# Altium PCB 新执行器202608.PcbDoc (part 2 of 2)
Units mm, origin at the board's own origin, x right, y up, seen from the top; angles counter-clockwise.
Board outline 67.11 x 92.2 mm, 2 copper layers (Top Layer, Bottom Layer); 111 components, 81 nets, 454 pads, 489 vias.
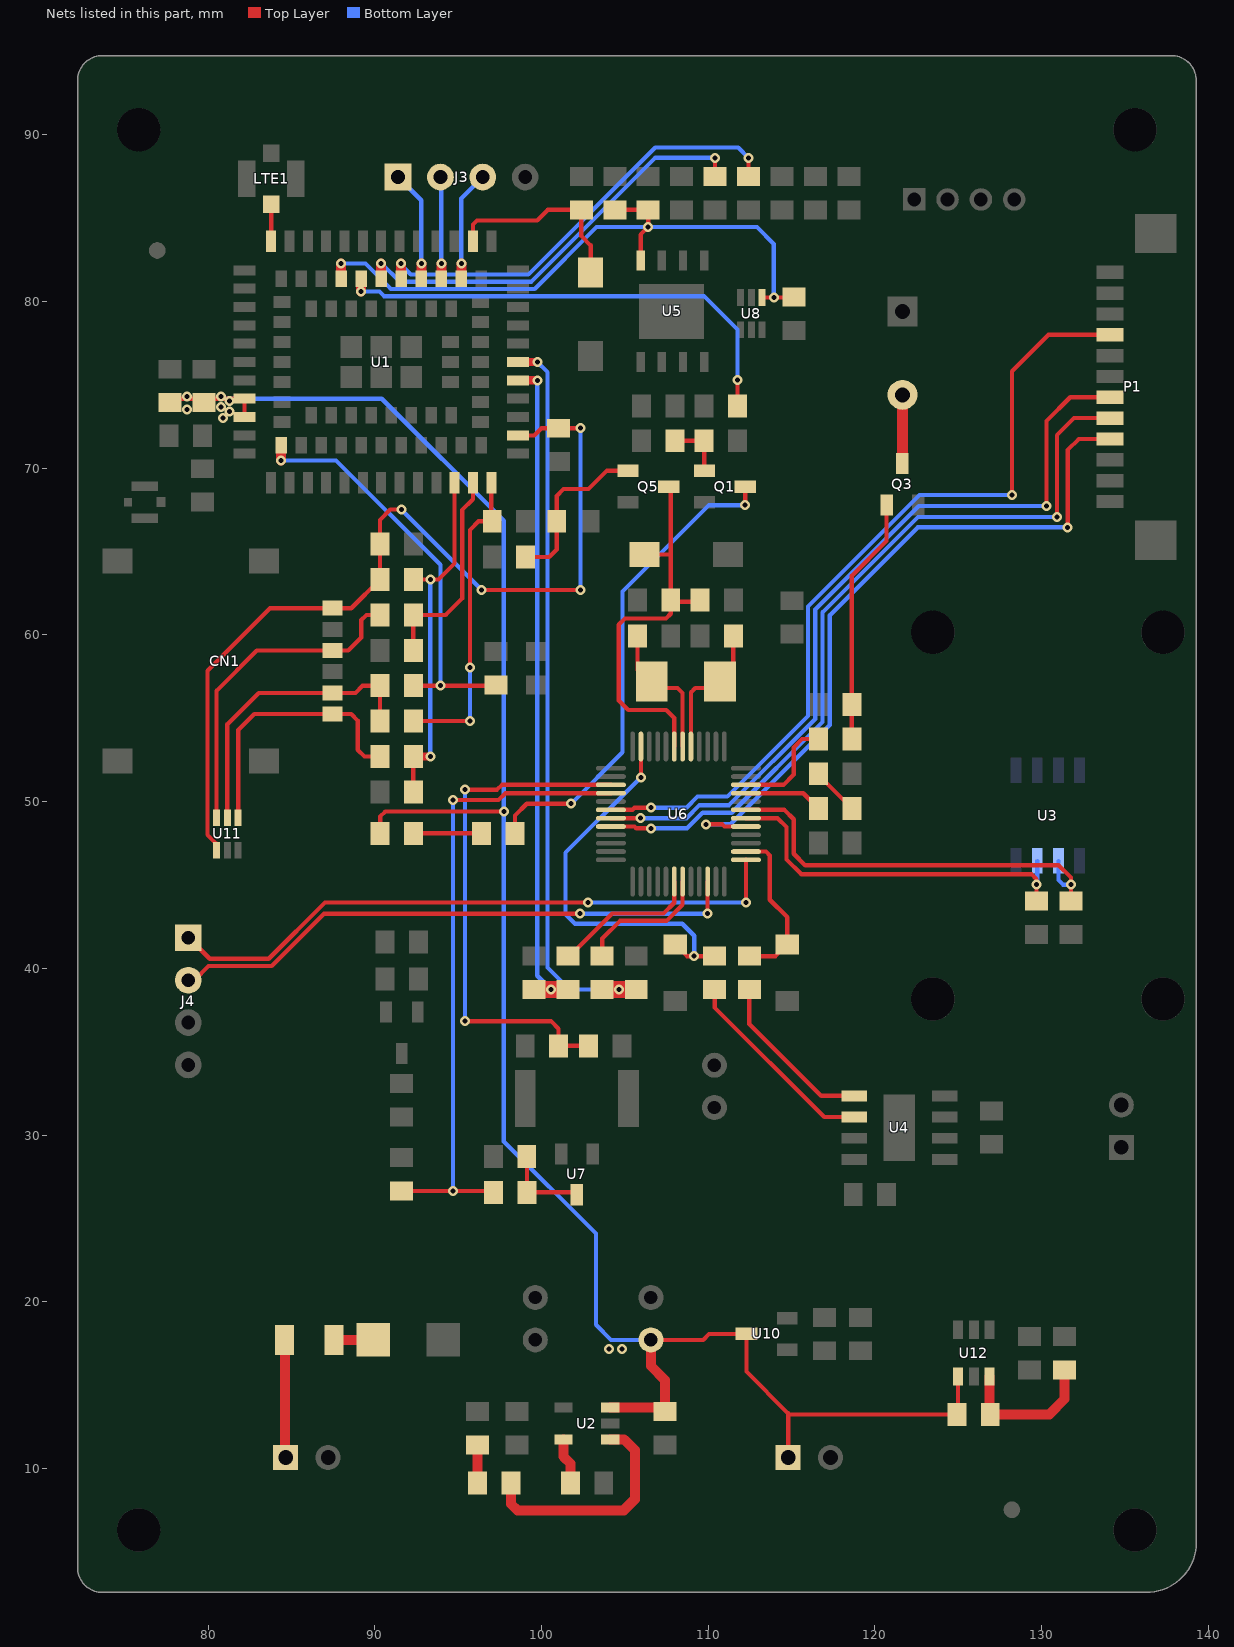
[diagram p2: the nets of this part, all layers, seen from the top]

## Via types
v1: diameter 0.6, hole 0.3, Top Layer to Bottom Layer, tented both sides, 330 vias
v2: diameter 0.65, hole 0.35, Top Layer to Bottom Layer, tented both sides, 147 vias
v3: diameter 0.6, hole 0.3, Top Layer to Bottom Layer, 12 vias

## Nets (pads, with @x,y where several pads share a name; then routed paths per layer and width w, separated by ;. In a path a pad name is that pad's centre, name@x,y a point inside that pad or via, vN(x,y) a via of type N, cw(c..) or ccw(c..) an arc to the next point about the centre after c; other vN are vias at no path point) (continued)
NetC31_1: C31.1 R44.2 U12.6 | length 8.8
  Top Layer w0.6: R44.2@126.878,13.271 U12.6@126.878,15.511 ; R44.2@126.913,13.236 130.457,13.236 131.377,14.156 C31.1@131.377,15.911
NetCN1_3: CN1.3 R43.1 U11.6 | length 19.9
  Top Layer w0.254: U11.6@80.501,49.03 80.501,56.646 82.917,59.062 CN1.3@87.454,59.062 88.399,59.062 89.186,59.849 89.186,60.893 89.494,61.201 R43.1@90.307,61.201
NetCN1_5: CN1.5 R45.1 R50.2 U11.5 | length 17.8
  Top Layer w0.254: U11.5@81.151,49.03 81.151,54.639 83.034,56.522 CN1.5@87.454,56.522 88.83,56.522 89.261,56.953 R50.2@90.307,56.953 R45.1@90.307,54.83
NetCN1_6: CN1.6 R48.1 U11.4 | length 16.2
  Top Layer w0.254: U11.4@81.801,49.03 81.801,54.29 82.763,55.252 CN1.6@87.454,55.252 88.585,55.252 88.969,54.868 88.969,53.11 89.373,52.706 R48.1@90.307,52.706
NetD1_1: D1.1 F1.2 | length 2.3
  Top Layer w0.6: F1.2@87.554,17.71 D1.1@89.904,17.71
NetD2_1: D2.1 R2.2 | length 4.1
  Top Layer w0.254: R2.2@92.317,48.096 D2.1@96.399,48.096
NetD2_2: D2.2 Q1.3 | length 29.4
  Top Layer w0.254: D2.2@98.399,48.096 98.399,49.159 99.112,49.872 v1(101.755,49.872) ; v1(112.215,67.785) Q1.3@112.215,68.903
  Bottom Layer w0.254: v1@101.761,49.867 104.854,52.96 104.854,62.598 110.041,67.785 v1(112.215,67.785)
NetD3_1: D3.1 R1.1 | length 2.3
  Top Layer w0.6: D3.1@96.158,9.134 R1.1@96.158,11.414
NetD3_2: D3.2 U2.1 | length 13.8
  Top Layer w0.6: D3.2@98.167,9.125 98.167,7.873 98.551,7.489 104.932,7.489 105.591,8.148 105.591,11.105 104.956,11.74 U2.1@104.117,11.74
NetD6_1: D6.1 R49.1 | length 2.9
  Top Layer w0.254: R49.1@116.612,51.671 116.612,51.59 D6.1@118.612,49.59
NetF1_1: F1.1 J1.1 | length 7
  Top Layer w0.6: J1.1@84.612,10.692 F1.1@84.612,17.71
NetLS1_2: LS1.2 Q3.3 | length 4.1
  Top Layer w0.65: Q3.3@121.646,70.284 LS1.2@121.646,74.399
NetLTE1_1: LTE1.1 U1.35 | length 2.2
  Top Layer w0.254: U1.35@83.783,83.62 LTE1.1@83.783,85.833
NetQ1_1: Q1.1 R3.1 R4.2 | length 3.5
  Top Layer w0.254: R3.1@108.006,71.648 R4.2@109.754,71.648 Q1.1@109.754,69.863
NetQ3_1: Q3.1 R12.1 R17.2 | length 14.9
  Top Layer w0.254: R12.1@118.612,53.753 R17.2@118.612,55.835 118.612,63.548 120.696,65.632 Q3.1@120.696,67.784
NetQ5_1: Q5.1 R22.2 R23.1 | length 10.2
  Top Layer w0.254: R22.2@99.041,64.677 100.46,64.677 100.911,65.128 R23.1@100.911,66.818 100.911,68.34 101.32,68.749 102.816,68.749 103.92,69.853 Q5.1@105.189,69.853
NetR5_2: R5.2 U2.5 | length 2.8
  Top Layer w0.6: U2.5@101.317,11.74 101.317,10.705 101.728,10.294 R5.2@101.728,9.125
NetR24_1: R24.1 U4.1 | length 10.1
  Top Layer w0.254: R24.1@112.461,38.73 112.461,36.667 116.779,32.349 U4.1@118.753,32.349
NetR25_1: R25.1 U4.2 | length 12.2
  Top Layer w0.254: R25.1@110.383,38.73 110.383,37.651 116.955,31.079 U4.2@118.753,31.079
NetR32_2: R32.2 R34.2 U7.3 | length 5
  Top Layer w0.254: R34.2@99.122,28.709 R32.2@99.122,26.56 U7.3@101.979,26.56
NetR35_1: R35.1 U6.31 | length 8.1
  Top Layer w0.254: R35.1@103.636,40.73 103.636,41.783 104.701,42.848 107.494,42.848 108.461,43.815 U6.31@108.461,45.206
NetR36_1: R36.1 U6.30 | length 9
  Top Layer w0.254: R36.1@101.592,40.73 101.69,40.73 104.242,43.282 107.314,43.282 107.961,43.929 U6.30@107.961,45.206
NRST: C8.2 Q5.3 R21.1 S1.2 U6.7 | length 24.2
  Top Layer w0.254: S1.2@106.184,64.826 107.748,64.826 ; Q5.3@107.748,68.793 C8.2@107.748,61.986 ; U6.7@107.961,53.306 107.961,55.013 107.482,55.492 105.2,55.492 104.628,56.064 104.628,60.614 105.004,60.99 107.47,60.99 107.748,61.268 C8.2@107.748,61.986 ; R21.1@109.474,61.986 C8.2@107.748,61.986
OSC_IN: C7.2 U6.5 Y1.2 | length 8.4
  Top Layer w0.254: U6.5@108.961,53.306 108.961,56.555 109.22,56.814 110.723,56.814 111.505,57.596 C7.2@111.505,59.82
OSC_OUT: C9.2 U6.6 Y1.1 | length 8.5
  Top Layer w0.254: C9.2@105.748,59.82 105.748,57.892 Y1.1@106.604,57.036 ; Y1.1@106.503,56.935 106.623,56.814 108.159,56.814 108.461,56.512 U6.6@108.461,53.306
PA1: D5.2 R25.2 U6.11 | length 24.1
  Top Layer w0.254: v1(105.961,51.447) U6.11@105.961,53.306 ; D5.2@108.022,41.43 108.722,40.73 v1(109.158,40.73) R25.2@110.383,40.73
  Bottom Layer w0.254: v1(105.961,51.447) 105.948,51.447 101.438,46.937 101.438,43.242 102.01,42.67 108.442,42.67 109.158,41.954 v1(109.158,40.73)
PA5_ADC: R42.2 R47.2 U6.15 | length 31.4
  Top Layer w0.254: v1(95.41,36.83) 100.57,36.83 101.022,36.378 R42.2@101.022,35.352 R47.2@102.819,35.352 ; v1(95.41,50.718) 97.332,50.718 97.62,51.006 U6.15@104.161,51.006
  Bottom Layer w0.254: v1(95.41,36.83) v1(95.41,50.718)
PA6_ADC: C15.1 R32.1 U6.16 | length 38.5
  Top Layer w0.254: C15.1@91.606,26.645 v1(94.689,26.645) R32.1@97.037,26.645 ; v1(94.689,50.096) 97.422,50.096 97.832,50.506 U6.16@104.161,50.506
  Bottom Layer w0.254: v1(94.689,26.645) v1(94.689,50.096)
PA9_TX1: R27.1 R36.2 U1.17 | length 40.1
  Top Layer w0.5: U1.17@98.583,75.27 v1(99.745,75.27)
  Top Layer w1: R27.1@99.548,38.73 v1(100.567,38.73) R36.2@101.592,38.73
  Bottom Layer w0.254: v1(99.745,75.27) 99.745,39.552 v1(100.567,38.73)
PA10_RX1: R28.1 R35.2 U1.18 | length 44.6
  Top Layer w0.5: U1.18@98.583,76.37 v1(99.745,76.37)
  Top Layer w1: R35.2@103.636,38.73 v1(104.657,38.73) R28.1@105.68,38.73
  Bottom Layer w0.254: v1(99.745,76.37) 100.352,75.763 100.352,40.048 101.67,38.73 v1(104.657,38.73)
PA15: D4.2 R24.2 U6.38 | length 9.9
  Top Layer w0.254: U6.38@112.261,47.006 113.457,47.006 113.691,46.772 113.691,44.114 114.737,43.068 D4.2@114.737,41.43 114.037,40.73 R24.2@112.461,40.73
PB0: P1.4 U6.18 | length 49.9
  Top Layer w0.254: U6.18@104.161,49.506 105.449,49.506 105.579,49.636 v1(106.57,49.636) ; v1(128.225,68.396) 128.225,75.818 130.412,78.005 P1.4@134.092,78.005
  Bottom Layer w0.254: v1(106.57,49.636) 108.686,49.636 109.35,50.3 111.146,50.3 115.988,55.142 115.988,61.712 122.672,68.396 v1(128.225,68.396)
PB1: P1.7 U6.19 | length 47.2
  Top Layer w0.254: U6.19@104.161,49.006 v1(105.928,49.006) ; v1(130.289,67.736) 130.289,72.825 131.719,74.255 P1.7@134.092,74.255
  Bottom Layer w0.254: v1(105.928,49.006) 108.699,49.006 109.48,49.787 111.246,49.787 116.422,54.963 116.422,61.532 122.626,67.736 v1(130.289,67.736)
PB2: P1.8 U6.20 | length 46.9
  Top Layer w0.254: U6.20@104.161,48.506 105.57,48.506 105.677,48.399 106.497,48.399 v1@106.57,48.472 ; v1(130.919,67.071) 130.919,71.984 131.94,73.005 P1.8@134.092,73.005
  Bottom Layer w0.254: v1(106.57,48.399) 108.731,48.399 109.665,49.333 111.406,49.333 116.856,54.783 116.856,61.353 122.574,67.071 v1(130.919,67.071)
PB5_WKUP6: P1.9 U6.41 | length 42.8
  Top Layer w0.254: v1(109.853,48.636) 110.844,48.636 110.974,48.506 U6.41@112.261,48.506 ; v1(131.561,66.454) 131.561,71.086 132.23,71.755 P1.9@134.092,71.755
  Bottom Layer w0.254: v1(109.853,48.636) 111.323,48.636 117.29,54.603 117.29,61.173 122.571,66.454 v1(131.561,66.454)
PB6_SCL: R19.2 U3.7 U6.42 | length 22.8
  Top Layer w0.254: U6.42@112.261,49.006 114.16,49.006 114.694,48.472 114.694,46.531 115.576,45.649 129.387,45.649 129.696,45.34 v3(129.696,45.018) R19.2@129.696,44.027
  Bottom Layer w0.254: v3@129.74,45.062 U3.7@129.74,46.445
PB7_SDA: R20.2 U3.6 U6.43 | length 25.8
  Top Layer w0.254: U6.43@112.261,49.506 114.563,49.506 115.128,48.941 115.128,46.871 115.821,46.178 131.029,46.178 131.755,45.452 v3(131.755,45.018) R20.2@131.755,44.027
  Bottom Layer w0.254: U3.6@131.01,46.445 131.01,45.294 131.286,45.018 v3(131.755,45.018)
PB8: D6.2 U6.45 | length 4.7
  Top Layer w0.254: U6.45@112.261,50.506 115.696,50.506 D6.2@116.612,49.59
PB9: R12.2 U6.46 | length 6.4
  Top Layer w0.254: U6.46@112.261,51.006 114.508,51.006 115.127,51.625 115.127,53.252 115.628,53.753 R12.2@116.612,53.753
SIM_CLK: C24.2 R45.2 U1.13 | length 18.7
  Top Layer w0.254: R45.2@92.308,54.83 v1(95.707,54.83) ; v1(95.707,58.053) 95.707,66.301 96.224,66.818 C24.2@97.04,66.818 ; C24.2@96.983,66.876 U1.13@96.983,69.12
  Bottom Layer w0.254: v1(95.707,54.83) v1(95.707,58.053)
SIM_DATA: C23.2 R48.2 R51.1 U1.11 | length 21.5
  Top Layer w0.254: C23.2@92.308,50.583 R48.2@92.308,52.706 ; R51.1@92.308,63.324 v1(93.323,63.324) 93.814,63.324 94.783,64.293 U1.11@94.783,69.12
  Top Layer w0.5: R48.2@92.308,52.706 v1(93.323,52.706)
  Bottom Layer w0.254: v1(93.323,52.706) v1(93.323,63.324)
SIM_RST: C25.2 R43.2 U1.12 | length 12.7
  Top Layer w0.254: C25.2@92.308,59.077 R43.2@92.308,61.201 94.246,61.201 95.236,62.191 95.236,67.492 95.883,68.139 U1.12@95.883,69.12
SIM_VDD: C22.1 C29.2 CN1.1 R51.2 U1.14 U11.1 | length 55.1
  Top Layer w0.254: U11.1@80.501,47.09 80.501,47.465 79.96,48.006 79.96,57.854 83.708,61.602 CN1.1@87.454,61.602 88.586,61.602 R51.2@90.307,63.324 C22.1@90.307,65.448 90.307,66.901 90.923,67.517 v1(91.587,67.517) ; v1(96.408,62.696) v1(102.333,62.696) ; U1.14@98.583,71.97 99.563,71.97 99.994,72.401 C29.2@101.011,72.401 v1(102.333,72.401)
  Bottom Layer w0.254: v1(91.587,67.517) v1(96.408,62.696) ; v1(102.333,62.696) v1(102.333,72.401)
SWCLK: J4.1 U6.37 | length 37.9
  Top Layer w0.254: J4.1@78.808,41.825 78.843,41.825 80.095,40.573 83.637,40.573 87.012,43.948 v1(102.774,43.948) ; v1(112.261,43.948) U6.37@112.261,46.506
  Bottom Layer w0.254: v1(102.774,43.948) v1(112.261,43.948)
SWDIO: J4.2 U6.34 | length 34.7
  Top Layer w0.254: J4.2@78.808,39.285 79.173,39.285 80.027,40.139 83.817,40.139 86.954,43.277 v1(102.307,43.277) ; v1(109.961,43.277) U6.34@109.961,45.206
  Bottom Layer w0.254: v1(102.307,43.277) v1(109.961,43.277)
USB_DN: J3.2 U1.60 | length 6
  Top Layer w0.6: U1.60@93.983,81.37 v1(93.983,82.275)
  Bottom Layer w0.254: v1(93.983,82.275) J3.2@93.983,87.416
USB_DP: J3.3 U1.59 | length 6.6
  Top Layer w0.6: U1.59@95.183,81.37 v1(95.183,82.275)
  Bottom Layer w0.254: v1(95.183,82.275) 95.183,86.176 J3.3@96.473,87.466
USIM2_CLK: R33.1 U1.62 | length 26.6
  Top Layer w0.254: R33.1@112.416,87.499 v1(112.416,88.619)
  Top Layer w0.6: U1.62@91.583,81.37 v1(91.583,82.275)
  Bottom Layer w0.254: v1(91.583,82.275) 91.583,82.191 92.149,81.625 99.207,81.625 106.817,89.235 111.799,89.235 v1(112.416,88.619)
USIM2_DAT: R38.1 U1.64 | length 28.9
  Top Layer w0.254: R38.1@111.755,73.735 v1(111.755,75.279)
  Top Layer w0.6: v1(89.183,80.595) U1.64@89.183,81.37
  Bottom Layer w0.254: v1(89.183,80.595) 90.274,80.595 90.546,80.323 109.748,80.323 111.755,78.316 v1(111.755,75.279)
USIM2_RST: R31.1 U1.63 | length 25.6
  Top Layer w0.254: R31.1@110.41,87.499 v1(110.41,88.619)
  Top Layer w0.6: U1.63@90.383,81.37 v1(90.383,82.275)
  Bottom Layer w0.254: v1(90.383,82.275) 90.405,82.275 91.489,81.191 99.387,81.191 106.815,88.619 v1(110.41,88.619)
USIM2_VDD: C13.1 C14.1 R37.2 U1.65 U5.8 U8.4 | length 39.8
  Top Layer w0.254: C14.1@104.392,85.499 C13.1@106.398,85.499 v1(106.398,84.465) 105.945,84.012 U5.8@105.945,82.457 ; U8.4@113.236,80.246 v1(113.931,80.246) R37.2@115.12,80.246
  Top Layer w0.6: U1.65@87.983,81.37 v1(87.983,82.275)
  Bottom Layer w0.254: v1(87.983,82.275) 89.441,82.275 90.959,80.757 99.593,80.757 103.301,84.465 v1(106.398,84.465) 112.916,84.465 113.931,83.45 v1(113.931,80.246)
VBAT: BT1.1 C2.2 C4.2 C5.2 C28.1 R2.1 R44.1 U1.42 U1.43 U2.3 U10.3 U12.4 | length 123.7
  Top Layer w0.254: C5.2@77.944,74.17 80.884,74.17 U1.42@82.183,74.17 U1.43@82.183,73.07 ; R2.1@90.316,48.096 90.316,49.101 90.628,49.413 v1(97.741,49.413) ; C28.1@106.558,17.71 109.697,17.71 110.051,18.064 U10.3@112.29,18.064 112.29,15.806 114.793,13.303 BT1.1@114.793,10.65 ; 114.86,13.236 R44.1@124.913,13.236 ; R44.1@124.978,13.301 U12.4@124.978,15.511
  Top Layer w0.6: U2.3@104.117,13.64 C2.2@107.183,13.64 ; C28.1@106.558,17.71 106.558,16.142 107.408,15.292 C2.2@107.408,13.414 107.408,14.837
  Bottom Layer w0.254: v1@80.884,74.17 90.416,74.17 97.732,66.854 97.732,29.616 103.264,24.084 103.264,18.619 104.173,17.71 C28.1@106.558,17.71
  other v1: 104.04,17.174 104.828,17.174 80.899,73.025 81.28,73.406 78.74,73.533 80.772,73.66 81.28,74.041 78.74,74.295 80.772,74.295
VBUS: J3.1 U1.61 | length 6.7
  Top Layer w0.6: U1.61@92.783,81.37 v1(92.783,82.275)
  Bottom Layer w0.254: J3.1@91.393,87.466 92.783,86.076 v1(92.783,82.275)
VDD_EXT: BOOT1.1 C3.2 U1.24 | length 11.9
  Top Layer w0.254: U1.24@95.883,83.62 95.883,84.615 96.134,84.866 99.742,84.866 100.375,85.499 C3.2@102.387,85.499 102.387,83.926 102.945,83.368 BOOT1.1@102.945,81.733
VREF: R29.2 R50.1 U1.99 | length 25.2
  Top Layer w0.254: R50.1@92.308,56.953 v1(93.933,56.953) R29.2@97.203,56.953
  Top Layer w0.6: v1(84.383,70.465) U1.99@84.383,71.37
  Bottom Layer w0.254: v1(84.383,70.465) 87.674,70.465 93.933,64.206 v1(93.933,56.953)
pads on no net: CN1.4 MK1. MK1.1 MK2. MK2.1 U1.3 U1.4 U1.5 U1.6 U1.8 U1.9 U1.15 U1.19 U1.20 U1.21 U1.22 U1.23 U1.26 U1.28 U1.29 U1.30 U1.31 U1.32 U1.33 U1.38 U1.39 U1.44 U1.49 U1.50 U1.51 U1.52 U1.53 U1.54 U1.55 U1.56 U1.57 U1.58 U1.66 U1.67 U1.68 U1.69 U1.74 U1.75 U1.76 U1.77 U1.78 U1.79 U1.80 U1.81 U1.83 U1.84 U1.85 U1.86 U1.87 U1.96 U1.97 U1.100 U1.101 U1.104 U1.105 U1.106 U1.107 U1.108 U1.109 U3.3 U3.5 U5.0 U5.2 U5.4 U5.5 U6.3 U6.4 U6.14 U6.17 U6.21 U6.22 U6.25 U6.29 U6.32 U6.33 U8.3 U11.3

## Polygon pours and split planes (outlines as drawn)
GND on Top Layer "Top Layer-No Net" (hatched 90Degree grid 0.254 track 0.254, remove dead copper, pour order 1000): 73.914,94.757 81.407,94.757 139.275,94.757 139.275,5.969 139.275,2.557 133.223,2.557 72.163,2.557 72.163,88.773 72.163,94.757 74.041,94.757
NetF1_1 on Top Layer "Top Layer-No Net" (hatched 90Degree grid 0.254 track 0.254, remove dead copper, pour order 24): 83.566,19.05 84.582,19.05 85.344,19.05 85.471,18.923 85.471,13.589 85.471,9.652 85.344,9.525 85.217,9.398 85.09,9.398 82.931,9.398 82.804,9.525 82.804,9.779 82.804,18.923 82.931,19.05 83.566,19.05
NetD1_1 on Top Layer "Top Layer-No Net" (hatched 90Degree grid 0.254 track 0.254, remove dead copper, pour order 23): 87.503,16.256 90.932,16.256 91.059,16.383 91.059,16.51 91.059,19.05 90.932,19.177 87.122,19.177 86.995,19.05 86.868,18.923 86.868,18.542 86.868,16.383 86.995,16.256 87.503,16.256
NetC1_1 on Top Layer "Top Layer-No Net" (hatched 90Degree grid 0.254 track 0.254, remove dead copper, pour order 22): 95.504,12.954 101.981,12.954 102.108,13.081 102.108,13.335 102.108,18.034 101.981,18.161 101.346,18.796 93.98,18.796 93.218,18.796 93.091,18.669 92.964,18.542 92.964,13.462 93.218,13.208 93.472,12.954 95.504,12.954
VBAT on Top Layer "Top Layer-No Net" (hatched 90Degree grid 0.254 track 0.254, remove dead copper, pour order 21): 103.632,13.462 105.537,13.462 105.918,13.081 106.172,12.827 107.95,12.827 109.728,12.827 109.982,12.573 110.109,12.446 110.109,12.319 110.109,10.287 110.363,10.033 110.744,9.652 112.014,9.652 115.443,9.652 115.57,9.779 115.57,9.906 115.57,13.462 114.046,14.986 113.03,16.002 113.03,17.399 113.03,18.542 112.903,18.669 112.141,18.669 103.759,18.669 103.505,18.415 103.378,18.288 103.378,14.859 103.378,13.462
VBAT on Top Layer "Top Layer-No Net" (hatched 90Degree grid 0.254 track 0.254, remove dead copper, pour order 20): 115.57,10.922 115.57,11.811 115.824,12.065 115.951,12.192 118.237,12.192 125.349,12.192 125.476,12.319 125.476,13.462 125.476,14.097 125.349,14.224 125.222,14.351 125.222,15.367 125.222,16.002 124.714,16.002 124.079,16.002 123.317,15.24 121.793,13.716 117.221,13.716 114.734,13.716
VBAT on Top Layer "Top Layer-No Net" (hatched 90Degree grid 0.254 track 0.254, remove dead copper, pour order 19): 123.37,15.293 122.428,14.351 116.459,14.351 113.972,14.351 114.427,13.896 114.427,13.132 122.682,13.132 123.19,13.64 123.37,13.82 123.37,14.859
VBAT on Top Layer "Top Layer-No Net" (hatched 90Degree grid 0.254 track 0.254, remove dead copper, pour order 18): 115.57,10.541 115.57,11.303 115.824,11.557 116.078,11.811 117.983,11.811 125.222,11.811 125.349,11.938 125.476,12.065 125.476,12.624 115.166,12.624 114.988,12.446 114.793,12.251 114.793,11.049
VBAT on Top Layer "Top Layer-No Net" (hatched 90Degree grid 0.254 track 0.254, remove dead copper, pour order 17): 77.089,74.549 82.931,74.549 83.058,74.422 83.058,74.295 83.058,72.898 82.931,72.771 82.55,72.771 80.772,72.771 80.645,72.898 80.391,73.152 79.248,73.152 76.835,73.152 76.708,73.279 76.708,73.406 76.708,74.549
+4.2V on Top Layer "Top Layer-No Net" (hatched 90Degree grid 0.254 track 0.254, remove dead copper, pour order 16): 99.314,36.195 88.392,36.195 88.265,36.068 87.503,35.306 87.503,33.782 87.503,23.749 87.757,23.495 88.392,22.86 95.885,22.86 122.301,22.86 122.428,22.733 122.555,22.606 122.555,21.971 122.555,18.161 122.682,18.034 122.936,17.78 126.111,17.78 126.111,23.876 125.857,24.13 124.841,25.146 93.726,25.146 90.297,25.146 90.043,25.4 89.662,25.781 89.662,30.607 89.662,32.004 90.043,32.385 90.17,32.512 91.313,32.512 93.345,32.512 93.472,32.385 93.472,32.131 93.472,30.861 93.599,30.734 93.853,30.48 99.568,30.48 99.568,35.941 99.314,36.195
+4.2V on Top Layer "Top Layer-No Net" (hatched 90Degree grid 0.254 track 0.254, remove dead copper, pour order 15): 126.111,19.228 126.111,19.685 126.365,19.939 126.636,20.21 127.381,20.21 130.285,20.21 130.556,19.939 130.81,19.685 130.81,17.399 132.08,17.399 132.08,19.558 132.08,20.193 131.699,20.574 131.445,20.828 130.429,20.828 126.545,20.828 125.91,21.463
+3.3V1 on Top Layer "Top Layer-No Net" (hatched 90Degree grid 0.254 track 0.254, remove dead copper, pour order 14): 115.443,18.415 119.253,18.415 119.761,18.415 119.888,18.542 119.888,18.669 119.888,20.701 119.634,20.955 118.872,21.717 117.602,21.717 83.312,21.717 81.407,23.622 79.756,25.273 79.756,32.131 79.756,34.798 79.502,35.052 78.74,35.052 77.851,35.052 77.724,34.925 77.724,34.544 77.724,25.4 80.899,22.225 81.661,21.463 109.22,21.463 113.411,21.463 113.665,21.209 114.046,20.828 114.046,19.05 114.046,18.669 114.173,18.542 114.3,18.415 115.443,18.415
+3.3V1 on Top Layer "Top Layer-No Net" (hatched 90Degree grid 0.254 track 0.254, remove dead copper, pour order 13): 78.74,35.052 77.978,35.052 77.597,35.433 77.123,35.907 77.123,36.957 77.123,43.007 77.825,43.709 77.847,43.688 80.391,43.688 82.169,43.688 84.582,43.688 85.471,44.577 86.868,45.974 95.504,45.974 100.306,45.974 100.838,46.506 94.361,46.506 86.257,46.506 84.836,45.085 84.201,44.45 82.169,44.45 77.47,44.45 77.089,44.069 76.708,43.688 76.708,42.545 76.708,33.962 77.904,32.766
+3.3V1 on Top Layer "Top Layer-No Net" (hatched 90Degree grid 0.254 track 0.254, remove dead copper, pour order 12): 99.695,41.402 95.758,41.402 95.631,41.275 95.631,41.148 95.631,38.227 96.012,37.846 96.52,37.338 100.457,37.338 106.426,37.338 106.68,37.592 106.901,37.813 106.901,39.116 106.901,38.094 106.698,37.891 106.526,37.719 105.41,37.719 98.541,37.719 98.299,37.961 98.299,38.227 98.299,39.879 98.552,40.132 98.679,40.259 100.203,40.259 100.203,41.402
+3.3V1 on Top Layer "Top Layer-No Net" (hatched 90Degree grid 0.254 track 0.254, remove dead copper, pour order 11): 106.901,39.751 106.901,40.132 106.901,42.127 107.188,42.414 106.426,42.414 105.406,42.414 105.283,42.291 104.902,41.91 104.902,40.767 104.902,40.259 105.791,40.259 106.647,40.259 106.901,40.005
+3.3V1 on Top Layer "Top Layer-No Net" (hatched 90Degree grid 0.254 track 0.254, remove dead copper, pour order 10): 124.079,48.006 124.587,48.006 124.587,53.213 131.699,60.325 134.874,63.5 134.874,68.326 133.35,68.326 133.35,68.199 133.35,62.865 129.54,59.055 123.825,53.34 123.825,48.26 123.825,48.006
+3.3V1 on Top Layer "Top Layer-No Net" (hatched 90Degree grid 0.254 track 0.254, remove dead copper, pour order 9): 123.063,86.868 122.301,86.868 120.65,86.868 120.269,86.487 119.888,86.106 118.364,86.106 115.697,86.106 115.697,84.836 122.809,84.836 122.936,84.963 123.063,85.09 123.063,85.471 123.063,86.868
+3.3V1 on Top Layer "Top Layer-No Net" (hatched 90Degree grid 0.254 track 0.254, remove dead copper, pour order 8): 114.554,59.309 115.57,59.309 116.459,59.309 116.84,59.69 117.729,60.579 117.729,73.533 117.729,84.328 118.237,84.836 115.75,84.836 116.586,84.836 116.84,84.582 117.094,84.328 117.094,70.866 117.094,61.341 116.586,60.833 116.332,60.579 114.3,60.579 114.3,59.309
+3.3V1 on Top Layer "Top Layer-No Net" (hatched 90Degree grid 0.254 track 0.254, remove dead copper, pour order 7): 110.998,62.865 112.649,62.865 113.284,62.865 113.411,62.738 113.411,62.484 113.411,60.96 113.538,60.833 113.792,60.579 114.681,60.579 114.681,59.36 114.63,59.309 114.48,59.309 113.03,59.309 112.903,59.436 112.776,59.563 112.776,60.325 112.776,61.087 112.649,61.214 112.395,61.468 110.998,61.468
+3.3V1 on Top Layer "Top Layer-No Net" (hatched 90Degree grid 0.254 track 0.254, remove dead copper, pour order 6): 113.464,59.309 114.248,59.309 115.01,58.547 116.407,59.944 116.766,59.944
NetC11_2 on Top Layer "Top Layer-No Net" (hatched 90Degree grid 0.254 track 0.254, remove dead copper, pour order 5): 104.775,33.909 107.061,33.909 107.442,33.528 108.331,32.639 110.109,32.639 111.76,32.639 114.173,30.226 115.57,28.829 119.38,28.829 119.38,25.908 119.253,25.781 119.126,25.781 105.029,25.781 104.902,25.908 104.775,26.035 104.775,30.607 104.775,33.909
NetC10_1 on Top Layer "Top Layer-No Net" (hatched 90Degree grid 0.254 track 0.254, remove dead copper, pour order 4): 123.698,30.099 127,30.099 136.017,30.099 136.144,29.972 136.144,29.845 136.144,27.432 136.017,27.305 135.89,27.305 123.571,27.305 123.444,27.432 123.444,28.067 123.444,30.099
NetC10_2 on Top Layer "Top Layer-No Net" (hatched 90Degree grid 0.254 track 0.254, remove dead copper, pour order 3): 123.698,30.734 129.032,30.734 135.89,30.734 136.144,30.988 136.144,31.242 136.144,32.893 136.017,33.02 135.763,33.02 123.571,33.02 123.444,32.893 123.444,32.385 123.444,30.734
+3.3V on Top Layer "Top Layer-No Net" (hatched 90Degree grid 0.254 track 0.254, remove dead copper, pour order 2): 89.916,36.83 91.186,36.83 91.313,36.957 91.313,37.084 91.313,42.164 91.186,42.291 91.059,42.291 89.662,42.291 89.535,42.164 89.535,36.957 89.662,36.83
+3.3V on Top Layer "Top Layer-No Net" (hatched 90Degree grid 0.254 track 0.254, remove dead copper, pour order 1): 89.916,44.45 91.059,44.45 104.394,44.45 104.394,44.958 104.267,44.958 99.695,44.958 91.059,44.958 90.932,45.085 90.805,45.085 89.789,45.085 89.662,44.958 89.662,44.45
+3.3V on Top Layer "Top Layer-No Net" (hatched 90Degree grid 0.254 track 0.254, remove dead copper, pour order 0): 118.237,51.054 121.031,51.054 123.19,51.054 123.317,51.181 123.444,51.308 123.444,51.943 123.444,53.467 127,57.023 132.969,62.992 132.969,67.31 132.969,68.707 133.096,68.834 133.223,68.961 133.985,68.961 136.271,68.961 136.271,69.596 132.588,69.596 132.461,69.469 132.334,69.342 132.334,68.58 132.334,63.754 126.873,58.293 120.904,52.324 118.11,52.324 118.11,51.054
GND on Bottom Layer "Top Layer-No Net" (hatched 90Degree grid 0.254 track 0.254, remove dead copper, pour order 1001): 73.914,94.757 81.407,94.757 139.275,94.757 139.275,5.969 139.275,2.557 133.223,2.557 72.163,2.557 72.163,88.773 72.163,94.757 74.041,94.757
VBAT on Bottom Layer "Top Layer-No Net" (hatched 90Degree grid 0.254 track 0.254, remove dead copper, pour order 33): 80.899,72.771 82.423,72.771 89.789,72.771 93.599,68.961 97.282,65.278 97.282,58.42 97.282,28.321 101.6,24.003 102.616,22.987 102.616,18.796 102.616,17.78 102.997,17.399 103.505,16.891 106.68,16.891 107.569,16.891 107.696,17.018 107.696,17.145 107.696,18.669 107.315,18.669 104.013,18.669 103.886,18.796 103.886,22.225 103.886,24.638 100.203,28.321 98.425,30.099 98.425,67.437 98.425,68.326 94.361,72.39 92.202,74.549 80.391,74.549 80.264,74.422 80.264,73.025 80.391,72.898 80.518,72.771 80.899,72.771
VBAT on Bottom Layer "Top Layer-No Net" (hatched 90Degree grid 0.254 track 0.254, remove dead copper, pour order 32): 81.46,72.771 78.613,72.771 78.486,72.898 78.359,73.025 78.359,73.406 78.359,74.295 78.613,74.549 80.772,74.549
+3.3V1 on Bottom Layer "Top Layer-No Net" (hatched 90Degree grid 0.254 track 0.254, remove dead copper, pour order 31): 96.012,40.386 96.901,40.386 96.901,46.482 95.758,46.482 95.758,40.386
+3.3V1 on Bottom Layer "Top Layer-No Net" (hatched 90Degree grid 0.254 track 0.254, remove dead copper, pour order 30): 105.791,37.338 106.045,37.338 114.046,37.338 124.206,47.498 124.587,47.879 124.587,48.895 124.587,49.403 124.46,49.403 123.952,49.403 123.825,49.276 123.825,49.149 123.825,48.26 122.809,47.244 113.284,37.719 105.537,37.719 105.537,37.338
+3.3V1 on Bottom Layer "Top Layer-No Net" (hatched 90Degree grid 0.254 track 0.254, remove dead copper, pour order 29): 117.348,70.231 121.158,70.231 132.334,70.231 132.715,69.85 133.35,69.215 133.35,67.691 133.35,66.04 133.985,66.04 133.985,69.977 133.35,70.612 132.461,71.501 117.094,71.501 117.094,70.231
+3.3V on Bottom Layer "Top Layer-No Net" (hatched 90Degree grid 0.254 track 0.254, remove dead copper, pour order 28): 89.916,40.132 90.678,40.132 90.932,40.132 91.059,40.259 91.059,40.386 91.059,44.958 90.932,45.085 90.805,45.085 89.789,45.085 89.662,44.958 89.662,44.831 89.662,40.132
+3.3V on Bottom Layer "Top Layer-No Net" (hatched 90Degree grid 0.254 track 0.254, remove dead copper, pour order 27): 103.632,44.45 116.332,44.45 122.682,50.8 123.063,51.181 130.048,51.181 130.048,52.832 125.349,52.832 122.936,52.832 120.396,50.292 115.062,44.958 103.505,44.958 103.124,44.958 103.124,44.45
+3.3V on Bottom Layer "Top Layer-No Net" (hatched 90Degree grid 0.254 track 0.254, remove dead copper, pour order 26): 126.418,51.181 127.508,51.181 127.762,50.927 128.016,50.673 128.016,49.403 128.016,41.783 128.143,41.656 128.778,41.656 128.778,49.276 129.921,50.419 130.048,50.546 130.048,51.689 128.196,51.689 127.942,51.943
+3.3V on Bottom Layer "Top Layer-No Net" (hatched 90Degree grid 0.254 track 0.254, remove dead copper, pour order 25): 135.509,68.961 136.271,68.961 136.271,78.486 135.763,78.994 134.366,80.391 120.65,80.391 120.65,78.486 134.239,78.486 134.747,77.978 135.255,77.47 135.255,68.961

## Keep-outs
Keep-Out Layer:
  pour cut-out: 132.209,6.308 ccw(c135.603,6.308) 135.603,2.914 ccw(c135.603,6.308) 138.998,6.308 ccw(c135.603,6.308) 135.603,9.702 ccw(c135.603,6.308)
  pour cut-out: 72.44,6.308 ccw(c75.834,6.308) 75.834,2.914 ccw(c75.834,6.308) 79.229,6.308 ccw(c75.834,6.308) 75.834,9.702 ccw(c75.834,6.308)
  pour cut-out: 72.44,90.308 ccw(c75.834,90.308) 75.834,86.914 ccw(c75.834,90.308) 79.229,90.308 ccw(c75.834,90.308) 75.834,93.702 ccw(c75.834,90.308)
  pour cut-out: 132.209,90.308 ccw(c135.603,90.308) 135.603,86.914 ccw(c135.603,90.308) 138.998,90.308 ccw(c135.603,90.308) 135.603,93.702 ccw(c135.603,90.308)
  pour cut-out: 134.848,60.157 ccw(c137.275,60.157) 137.275,57.73 ccw(c137.275,60.157) 139.702,60.157 ccw(c137.275,60.157) 137.275,62.584 ccw(c137.275,60.157)
  pour cut-out: 121.048,60.157 ccw(c123.475,60.157) 123.475,57.73 ccw(c123.475,60.157) 125.902,60.157 ccw(c123.475,60.157) 123.475,62.584 ccw(c123.475,60.157)
  pour cut-out: 134.848,38.157 ccw(c137.275,38.157) 137.275,35.73 ccw(c137.275,38.157) 139.702,38.157 ccw(c137.275,38.157) 137.275,40.584 ccw(c137.275,38.157)
  pour cut-out: 121.048,38.157 ccw(c123.475,38.157) 123.475,35.73 ccw(c123.475,38.157) 125.902,38.157 ccw(c123.475,38.157) 123.475,40.584 ccw(c123.475,38.157)
  lines w0.127: 72.163,4.057 ccw(c73.663,4.057) 73.663,2.557 136.275,2.557 ccw(c136.275,5.557) 139.275,5.557 139.275,93.257 ccw(c137.775,93.257) 137.775,94.757 73.663,94.757 ccw(c73.663,93.257) 72.163,93.257 72.163,4.057

## Silkscreen, mask and mechanical layers (free items; w line width, h text height)
Top Overlay:
  drawing of 19 lines, arcs and shapes, not listed
  text "TTL串口" at 120.941,92.023 h2.54
  text "USB" at 92.991,91.125 h2.54
  text "3V3" at 121.061,89.726 h0.8
  text "TX" at 123.658,89.726 h0.8
  text "RX" at 125.661,89.726 h0.8
  text "GND" at 127.679,89.726 h0.8
  text "V+" at 90.492,89.171 h0.8
  text "DN" at 93.151,89.171 h0.8
  text "DP" at 95.685,89.171 h0.8
  text "GND" at 97.775,89.171 h0.8
  text "显示板排线" at 127.973,82.336 h3 r270
  text "B3" at 131.651,81.447 h0.8
  text "B4" at 131.651,80.187 h0.8
  text "C13" at 130.984,78.947 h0.8
  text "B0" at 131.651,77.697 h0.8
  text "SCL" at 130.851,76.447 h0.8
  text "SDA" at 130.851,75.197 h0.8
  text "B1" at 131.651,73.947 h0.8
  text "B2" at 131.651,72.707 h0.8
  text "B5" at 131.651,71.448 h0.8
  text "GND" at 130.851,70.198 h0.8
  text "3V3" at 130.851,68.967 h0.8
  text "3V3" at 130.851,67.647 h0.8
  text "CLK" at 80.466,41.457 h0.8
  text "DIO" at 80.466,38.914 h0.8
  text "GND" at 80.466,36.498 h0.8
  text "3V3" at 80.466,33.807 h0.8
  text "M-" at 129.82,31.596 h0.8
  text "SWD" at 76.242,30.358 h3
  text "M+" at 129.82,28.949 h0.8
  text "电机" at 132.106,24.168 h3
  text "V2608" at 77.079,20.942 h0.8
  text "太阳能" at 81.594,5.009 h3
  text "电池" at 113.817,4.949 h3
Bottom Overlay:
  circle w0.127: c130.375,49.157 r9
  circle w0.127: c130.375,49.157 r5.5
Mechanical 1:
  the board outline again, w0.127
Mechanical 15:
  circle w0.127: c75.834,90.308 r1.3
  circle w0.127: c135.603,90.308 r1.3
  circle w0.127: c75.834,6.308 r1.3
  circle w0.127: c123.475,38.157 r1.3
  circle w0.127: c123.475,60.157 r1.3
  circle w0.127: c137.275,60.157 r1.3
  circle w0.127: c135.603,6.308 r1.3
  circle w0.127: c137.275,38.157 r1.3
  lines w0.127: 126.375,45.157 126.375,53.157 134.375,53.157 134.375,45.157 126.375,45.157

## Dimensions
72.163,93.257 to 139.275,93.257 on Top Overlay
73.663,94.757 to 73.663,2.557 on Top Overlay

## Text inside footprints (layer, text, board x,y; h text height)
C1: Top Overlay "+" at 98.715,17.391 h0.8 r90
C12: Top Overlay "+" at 109.457,31.328 h0.8 r90
C28: Top Overlay "+" at 105.648,17.391 h0.8 r90
CN1: Top Overlay "VCC" at 84.453,61.218 h0.8; Top Overlay "RST" at 84.453,58.679 h0.8; Top Overlay "GND" at 84.453,59.949 h0.8; Top Overlay "VPP" at 84.453,57.409 h0.8; Top Overlay "CLK" at 84.453,56.139 h0.8; Top Overlay "IO" at 85.386,54.869 h0.8